# Altium PCB Gear_Trak-v1.0.PcbDoc (part 4 of 5)
Units mil, origin at the board's own origin, x right, y up, seen from the top; angles counter-clockwise.
Board outline 1383 x 2953 mil, 6 copper layers (TOP LAYER, GROUND1, SIGNAL, GROUND2, POWER, BOTTOM LAYER), stack 60.865 mil thick; 166 components, 125 nets, 751 pads, 771 vias.
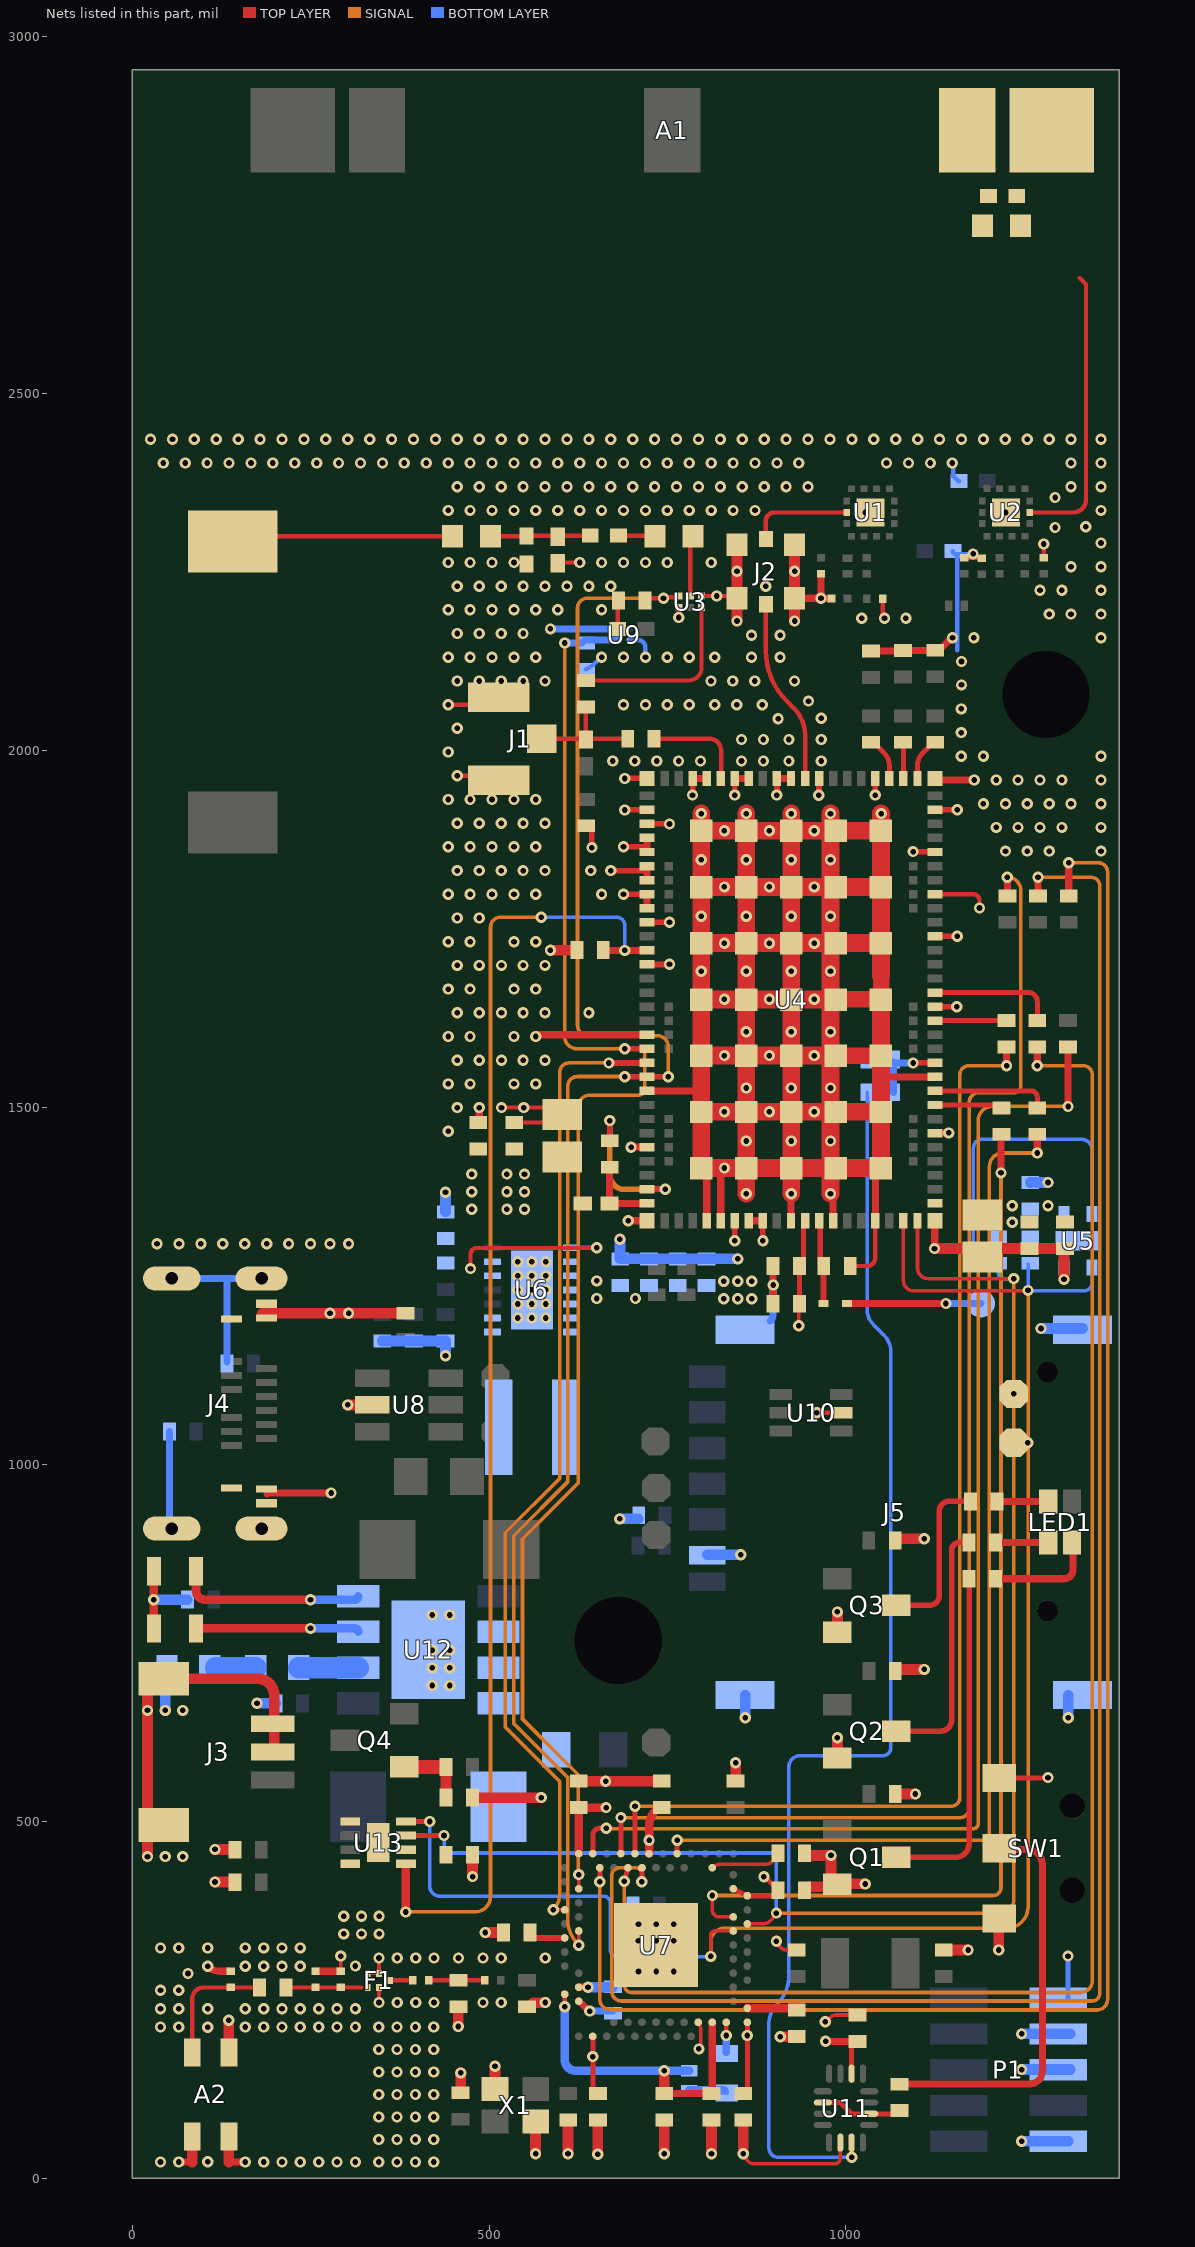
[diagram p6: the nets of this part, all layers, seen from the top]

## Via types
v1: diameter 15.75, hole 7.87, TOP LAYER to BOTTOM LAYER, tented both sides, 771 vias

## Nets (pads, with @x,y where several pads share a name; then routed paths per layer and width w, separated by ;. In a path a pad name is that pad's centre, name@x,y a point inside that pad or via, vN(x,y) a via of type N, cw(c..) or ccw(c..) an arc to the next point about the centre after c; other vN are vias at no path point) (continued)
GND: (continued)
  other v1: 39.84,22.61 106.15,22.76 184.28,22.61 209.98,22.61 235.68,22.61 261.38,22.61 287.08,22.61 312.78,22.61 345.44,22.61 371.14,22.61 396.84,22.61 422.54,22.61 345.44,54.11 371.14,54.11 396.84,54.11 422.54,54.11 345.44,85.61 371.14,85.61 396.84,85.61 422.54,85.61 345.44,117.11 371.14,117.11 396.84,117.11 422.54,117.11 345.44,148.6 371.14,148.6 396.84,148.6 422.54,148.6 345.44,180.1 371.14,180.1 396.84,180.1 422.54,180.1 794,181 39.84,211.6 65.54,211.6 106.15,211.46 158.58,211.6 184.28,211.6 209.98,211.6 235.68,211.6 261.38,211.6 287.08,211.6 312.78,211.6 345.44,211.6 371.14,211.6 396.84,211.6 422.54,211.6 39.84,237.3 65.54,237.3 106.15,237.16 158.58,237.3 184.28,237.3 209.98,237.3 235.68,237.3 261.38,237.3 287.08,237.3 312.78,237.3 371.54,245.88 397.24,245.88 422.94,245.88 491.52,245.88 517.22,245.88 39.84,263 65.54,263 78.3,286.56 709.31,289.32 734,289.32 758.69,289.32 158.58,296.7 184.28,296.7 209.98,296.7 235.68,296.7 312.78,297.14 371.54,308.28 397.24,308.28 422.94,308.28 457.23,308.28 491.52,308.28 517.22,308.28 578.8,308.28 39.84,322.26 65.54,322.26 106.15,322.26 158.58,322.4 184.28,322.4 209.98,322.4 235.68,322.4 709.31,332.69 734,332.69 758.69,332.69 296.63,342 321.31,342 346,342 709.31,355.37 734,355.37 758.69,355.37 296.63,366.69 321.31,366.69 346,366.69 1027,412 46.32,450.37 71,450.37 71,655.09 420.31,690 445,690 420.31,714.69 445,714.69 420.31,739.37 445,739.37 420.31,788.74 445,788.74 35,1308.69 65.7,1308.69 96.4,1308.69 127.1,1308.69 157.8,1308.69 188.5,1308.69 219.2,1308.69 249.9,1308.69 277.28,1308.69 303.32,1308.69 844.23,1312.86 883.6,1312.86 442.8,1466.29 829.71,1493.6 892.7,1493.6 955.69,1493.6 455.65,1499.49 442.8,1532.69 473.5,1532.69 534.9,1532.69 565.6,1532.69 455.65,1565.89 486.35,1565.89 517.43,1565.89 547.75,1565.89 578.45,1565.89 829.71,1572.34 892.7,1572.34 442.8,1599.09 473.5,1599.09 534.9,1599.09 565.6,1599.09 455.65,1632.29 486.35,1632.29 517.43,1632.29 547.75,1632.29 578.45,1632.29 639.85,1632.29 1155.02,1640.87 829.71,1651.08 892.7,1651.08 955.69,1651.08 442.8,1665.49 473.5,1665.49 534.9,1665.49 565.6,1665.49 455.65,1698.69 486.35,1698.69 517.43,1698.69 547.75,1698.69 578.45,1698.69 752.72,1700.13 829.71,1729.82 892.7,1729.82 955.69,1729.82 442.8,1731.89 473.5,1731.89 534.9,1731.89 565.6,1731.89 1156,1739.63 752.72,1759.18 455.65,1765.09 486.35,1765.09 442.8,1798.29 473.5,1798.29 504.2,1798.29 534.9,1798.29 565.6,1798.29 657.7,1798.29 688.4,1798.29 829.71,1808.56 892.7,1808.56 955.69,1808.56 455.65,1831.49 486.35,1831.49 517.05,1831.49 547.75,1831.49 578.45,1831.49 642.35,1831.49 670.55,1831.49 1223.39,1858.77 1253.85,1858.77 1284.55,1858.77 1357.21,1858.77 644.13,1863.71 442.8,1864.69 473.5,1864.69 504.2,1864.69 534.9,1864.69 565.6,1864.69 829.71,1887.3 892.7,1887.3 955.69,1887.3 1210.54,1891.97 1241,1891.97 1271.7,1891.97 1302.4,1891.97 1357.21,1891.97 752.72,1896.71 455.65,1897.89 486.35,1897.89 517.05,1897.89 547.75,1897.89 578.45,1897.89 690.13,1916.39 1156,1916.8 1192.45,1925.17 1223.39,1925.17 1253.85,1925.17 1284.55,1925.17 1315.25,1925.17 1357.21,1925.17 442.8,1931.09 473.5,1931.09 504.2,1931.09 534.9,1931.09 565.6,1931.09 785.02,1937.19 844.07,1937.19 903.13,1937.19 1040.93,1937.19 1179.6,1958.37 1210.54,1958.37 1241,1958.37 1271.7,1958.37 1302.4,1958.37 1357.21,1958.37 690.13,1960.49 673.39,1985 704.09,1985 734.79,1985 765.49,1985 796.19,1985 853.6,1985 884.3,1985 920,1985 965.37,1985 1161.51,1991.57 1192.45,1991.57 1357.21,1991.57 442.8,1997.49 853.6,2015 884.3,2015 920,2015 965.37,2015 1161.51,2024.77 455.65,2030.69 904.86,2044.2 965.37,2045 1161.51,2057.97 688.4,2063.89 719.1,2063.89 749.8,2063.89 780.5,2063.89 816.2,2063.89 846.9,2063.89 882.6,2063.89 947.5,2068.89 1161.75,2091.52 455.65,2097.09 486.35,2097.09 517.05,2097.09 547.75,2097.09 578.45,2097.09 810.85,2097.09 841.55,2097.09 872.25,2097.09 927.91,2097.09 1161.75,2124.37 442.8,2130.29 473.5,2130.29 504.2,2130.29 534.9,2130.29 565.6,2130.29 688.4,2130.29 749.8,2130.29 780.5,2130.29 816.2,2130.29 867.6,2130.29 907.73,2130.29 1179.21,2157.57 1357.21,2157.57 867.6,2160.99 907.73,2160.99 455.65,2163.49 486.35,2163.49 517.05,2163.49 547.75,2163.49 1022,2185 1083.94,2185 765.9,2186 1284.55,2190.77 1315.25,2190.77 1357.21,2190.77 442.8,2196.69 473.5,2196.69 504.2,2196.69 534.9,2196.69 565.6,2196.69 596.3,2196.69 657.7,2196.69 1271.7,2223.97 1302.4,2223.97 1357.21,2223.97 455.65,2229.89 486.35,2229.89 517.05,2229.89 547.75,2229.89 578.45,2229.89 609.15,2229.89 639.85,2229.89 670.55,2229.89 887.66,2229.89 847.29,2250.8 928,2250.8 1315.25,2257.17 1357.21,2257.17 442.8,2263.09 473.5,2263.09 504.2,2263.09 657.7,2263.09 688.4,2263.09 719.1,2263.09 749.8,2263.09 811.2,2263.09 1357.21,2290.37 1292.93,2312.09 1335.92,2313.18 1027,2333 1224,2333 442.8,2336 473.5,2336 504.2,2336 534.9,2336 565.6,2336 596.3,2336 627,2336 657.7,2336 688.4,2336 719.1,2336 749.8,2336 780.5,2336 811.2,2336 841.9,2336 872.6,2336 1357.21,2336 1292.93,2354.05 455.65,2369.2 486.35,2369.2 517.05,2369.2 547.75,2369.2 578.45,2369.2 609.15,2369.2 639.85,2369.2 670.55,2369.2 701.25,2369.2 731.95,2369.2 762.65,2369.2 793.35,2369.2 824.05,2369.2 854.75,2369.2 885.45,2369.2 916.15,2369.2 946.85,2369.2 1315.25,2369.2 1357.21,2369.2 43.7,2402.4 74.4,2402.4 105.1,2402.4 135.8,2402.4 166.5,2402.4 197.2,2402.4 227.9,2402.4 258.6,2402.4 289.3,2402.4 320,2402.4 350.7,2402.4 381.4,2402.4 412.1,2402.4 442.8,2402.4 473.5,2402.4 504.2,2402.4 534.9,2402.4 565.6,2402.4 596.3,2402.4 627,2402.4 657.7,2402.4 688.4,2402.4 719.1,2402.4 749.8,2402.4 780.5,2402.4 811.2,2402.4 841.9,2402.4 872.6,2402.4 903.3,2402.4 934,2402.4 1056.8,2402.4 1087.5,2402.4 1118.2,2402.4 1315.25,2402.4 1357.21,2402.4 25.85,2435.6 56.55,2435.6 87.25,2435.6 117.95,2435.6 148.65,2435.6 179.35,2435.6 210.05,2435.6 240.75,2435.6 271.45,2435.6 302.15,2435.6 332.85,2435.6 363.55,2435.6 394.25,2435.6 424.95,2435.6 455.65,2435.6 486.35,2435.6 517.05,2435.6 547.75,2435.6 578.45,2435.6 609.15,2435.6 639.85,2435.6 670.55,2435.6 701.25,2435.6 731.95,2435.6 762.65,2435.6 793.35,2435.6 824.05,2435.6 854.75,2435.6 885.45,2435.6 916.15,2435.6 946.85,2435.6 977.55,2435.6 1008.25,2435.6 1038.95,2435.6 1069.65,2435.6 1100.35,2435.6 1131.05,2435.6 1161.75,2435.6 1192.45,2435.6 1223.15,2435.6 1253.85,2435.6 1284.55,2435.6 1315.25,2435.6 1357.21,2435.6
GPS_RF1: C13.1 U3.3 | length 256.8
  TOP LAYER w5.75: C13.1@635.64,2097.84 779.73,2097.84 ccw(c779.73,2115.74) 797.63,2115.74 U3.3@797.63,2200.3
I2C_SCL: R31.2 TP5.1 U4.20 U5.2 U7.R1 U13.7 | length 2591.4
  TOP LAYER w5: U7.R1@861.85,356.02 883.08,356.02 ccw(c883.08,371.7) 895.48,362.11 v1(902.49,371.17) ; U4.20@1100.16,1340.94 1100.16,1274.84 ccw(c1115,1274.84) 1115,1260 v1(1235,1260)
  TOP LAYER w7: U13.7@383.64,479.84 v1(437,479.84)
  SIGNAL w5: v1(902.49,371.17) 1215.59,371.17 ccw(c1215.59,390.58) 1235,390.58 v1(1235,1260)
  BOTTOM LAYER w5: v1(437,479.84) 437,463.15 ccw(c444.81,463.15) 444.81,455.34 894.03,455.34 cw(c894.03,446.88) 902.49,446.88 v1(902.49,371.17) ; v1(1235,1260) 1221.8,1260 cw(c1221.8,1268.37) 1213.43,1268.37 1213.43,1281.5 R31.2@1213,1281.5 1191.65,1281.5 cw(c1191.65,1294.64) 1178.51,1294.64 1178.51,1442.64 cw(c1190.86,1442.64) 1190.86,1455 1330.08,1455 cw(c1330.08,1440.39) 1344.68,1440.39 U5.2@1344.69,1350.4
  other v1: 1235,1098.52
I2C_SDA: R32.2 TP4.1 U4.19 U5.3 U7.P2 U13.8 | length 2444.3
  TOP LAYER w5: v1(810.56,310.51) 810.56,340.36 cw(c816.38,340.36) 816.38,346.18 U7.P2@842.17,346.18 ; U4.19@1080.48,1340.94 1080.48,1256.88 ccw(c1094.36,1256.88) 1094.36,1243 v1@1255,1243
  TOP LAYER w7: U13.8@383.64,499.53 v1(417,499.53)
  SIGNAL w5: v1(810.56,310.51) 810.56,330.56 cw(c830,330.56) 830,350 1225,350 ccw(c1225,380) 1255,380 v1(1255,1243.37)
  BOTTOM LAYER w5: v1(417,499.53) 417,409 ccw(c431,409) 431,395 660,395 cw(c660,385) 670,385 670,320.4 ccw(c680.4,320.4) 680.4,310 810.56,310 v1(810.56,310.51) ; R32.2@1255,1280 v1(1255,1243.37) 1255,1243 1334,1243 ccw(c1334,1253.69) 1344.69,1253.69 U5.3@1344.69,1275.6
  other v1: 1254.69,1030.01
LTE_RF: J2.3 U1.13 | length 145.2
  TOP LAYER w6.17: J2.3@887.66,2295.81 887.66,2320.95 cw(c899.79,2320.95) 899.79,2333.07 U1.13@1000.82,2333.07
MCU_IF0: R33.1 U7.T2 | length 1522.1
  TOP LAYER w5: v1(812.88,395.8) 812.64,395.55 812.64,375.92 ccw(c822.69,375.92) 822.69,365.87 U7.T2@842.17,365.87
  TOP LAYER w10: v1@1217,1406.87 R33.1@1217,1462.14
  SIGNAL w5: v1(812.88,395.8) 1205.83,395.8 ccw(c1205.83,407.06) 1217.1,407.06 v1(1217.1,1408)
MCU_IF1: R36.1 U7.AD10 | length 1501.9
  TOP LAYER w7: U7.AD10@763.43,454.45 763.49,454.52 763.49,474.12 v1@763.56,474.19
  TOP LAYER w10: v1(1268,1435.89) R36.1@1268,1462.14
  SIGNAL w5: v1(763.56,473.19) 1193.57,473.19 ccw(c1193.57,480.5) 1200.89,480.5 1200.89,1416.93 cw(c1219.84,1416.93) 1219.84,1435.89 v1(1268,1435.89)
MCU_IF2: R37.1 U7.AD16 | length 1639.6
  TOP LAYER w7: U7.AD16@704.45,454.53 v1@704.45,520.91
  TOP LAYER w10: v1(1225,1558) R37.1@1225,1584.25
  SIGNAL w5: v1(704.53,520.91) 1147.25,520.91 ccw(c1147.25,533.23) 1159.58,533.23 1159.58,1545.69 cw(c1171.88,1545.69) 1171.88,1558 v1(1225,1558)
MCU_IF3: R38.1 U7.AC17 | length 2215.4
  TOP LAYER w7: v1@689.45,415.83 U7.AC17@694.53,434.76
  TOP LAYER w10: v1(1268,1558) R38.1@1268,1584.25
  SIGNAL w5: v1(689.37,415.78) 689.37,270.63 ccw(c700,270.63) 700,260 1328.59,260 ccw(c1328.59,276.41) 1345,276.41 1345,1545.74 ccw(c1332.74,1545.74) 1332.74,1558 v1(1268,1558)
MCU_IF4: R39.1 U7.AD22 | length 1780
  TOP LAYER w7: U7.AD22@645.31,454.45 645.31,480.21 cw(c655.19,480.21) 655.19,490.08 v1(664.17,490.08)
  TOP LAYER w10: R39.1@1311,1584.25 R39.1@1311,1584.25 v1@1311.04,1502
  SIGNAL w5: v1(664.17,490.08) 664.76,489.48 1178.61,489.48 ccw(c1178.61,496.06) 1185.19,496.06 1185.19,1481.32 cw(c1204.94,1481.32) 1204.94,1501.07 v1(1311.07,1501.07)
MCU_IF5: R40.1 U7.AC21 | length 2599.5
  TOP LAYER w7: v1@655.09,415.09 U7.AC21@655.09,434.7
  TOP LAYER w10: R40.1@1312,1796.05 v1(1312,1842.3)
  SIGNAL w5: v1(655.02,415.02) 655.02,251.01 ccw(c670.53,251.01) 670.53,235.5 1351.72,235.5 ccw(c1351.72,250.14) 1366.36,250.14 1366.36,1829.61 ccw(c1353.63,1829.57) 1353.63,1842.3 v1(1312,1842.3)
MCU_IF6: R41.1 U7.AC15 | length 2614.6
  TOP LAYER w7: v1@714.15,415.09 U7.AC15@714.15,434.7
  TOP LAYER w10: R41.1@1269,1796.05 v1(1269,1822.3)
  SIGNAL w5: v1(714.08,415.02) 714.08,426.12 ccw(c705.68,426.12) 705.68,434.52 682.18,434.52 ccw(c682.18,424.13) 671.8,424.13 671.8,261.81 ccw(c685.5,261.81) 685.5,248.1 1344.97,248.1 ccw(c1344.97,258.49) 1355.36,258.49 1355.36,1810.25 ccw(c1343.31,1810.25) 1343.31,1822.3 v1(1269,1822.3)
MCU_IF7: R42.1 U7.AD18 | length 1949.6
  TOP LAYER w7: U7.AD18@684.69,454.45 v1(684.68,505)
  TOP LAYER w10: R42.1@1226,1796.05 v1(1226,1822.3)
  SIGNAL w5: v1@684.76,505 1160,505 ccw(c1160,517.58) 1172.58,517.58 1172.58,1506.76 cw(c1186.1,1506.76) 1186.1,1520.28 1234.89,1520.28 ccw(c1234.89,1530.4) 1245,1530.4 1245,1803.3 ccw(c1226,1803.3) v1(1226,1822.3)
NetA1_2: A1.2 C1.2 L1.2
NetANT1_1: ANT1.1 L7.2 | length 311
  TOP LAYER w6.17: ANT1.1@141,2292.54 148,2299.54 L7.2@449.08,2299.54
NetC8_1: C8.1 L6.2 | length 51.9
  TOP LAYER w6.17: C8.1@681.17,2300.54 731.62,2300.54 L6.2@732.62,2299.54
NetC12_1: C12.1 C13.2 J1.1 L9.2 | length 166.5
  TOP LAYER w6.17: J1.1@573.68,2016.17 L9.2@635.64,2016.17 ; L9.2@635.64,2014.94 L9.2@635.64,2016.17 ; C13.2@635.64,2060.84 L9.2@635.64,2016.17 ; C12.1@694.26,2016.17 L9.2@635.64,2016.17
NetC12_2: C12.2 U4.67 | length 142.8
  TOP LAYER w6.17: C12.2@731.26,2016.17 808.83,2016.17 cw(c808.83,2000) 825,2000 825,1960.62 U4.67@824.57,1960.62
NetC23_1: C23.1 R13.2 U4.32 | length 100.4
  TOP LAYER w7.87: v1(1094,1562) 1094.1,1562.1 U4.32@1124.42,1562.1
  BOTTOM LAYER w10: R13.2@1066.5,1521 1066.5,1563 1067.5,1562 v1(1094,1562)
NetC34_2: C34.2 L12.1 L13.2 | length 78.3
  TOP LAYER w6.17: L12.1@415.57,277.08 C34.2@457.23,277.08 L13.2@493.9,277.08
NetC35_2: C35.2 CR1.2 F1.4 R18.2 | length 105.3
  TOP LAYER w6.17: R18.2@215.5,267 320.8,267
NetC37_1: C37.1 U7.N24 | length 53.1
  TOP LAYER w7.87: C37.1@557.5,344 557.5,341.35 562.56,336.28 U7.N24@605.94,336.34
NetC49_2: C49.2 R11.1 U6.1 U6.12 U6.13 | length 238.2
  TOP LAYER w5.9: v1(474,1274) 474,1294 cw(c483,1294) 483,1303 v1(651,1303)
  BOTTOM LAYER w5.9: U6.1@615.12,1303.15 651,1303.15 v1(651,1303)
NetC54_1: C54.1 U7.AC5 | length 100.7
  TOP LAYER w5: U7.AC5@812.64,434.76 cw(c823.98,423.43) 816.77,437.75 cw(c823.98,423.43) 823.98,439.46 886.56,439.46 ccw(c886.56,455) 897.78,444.25 898.5,445 C54.1@905,455
NetD1_1: D1.1 TP1.1 | length 187.5
  TOP LAYER w10: D1.1@1001.54,1225 v1(1140,1225)
  BOTTOM LAYER w10: v1(1140,1225) TP1.1@1189,1225
NetFB1_2: FB1.2 R2.2 U4.102 | length 104
  TOP LAYER w10: FB1.2@668.7,1365 FB1.2@668.7,1365.35 ; R2.2@669,1416 668.7,1416 FB1.2@668.7,1365.35 ; U4.102@721.43,1365.35 FB1.2@668.7,1365.35
NetJ2_1: J2.1 U4.61 | length 259.5
  TOP LAYER w6.17: J2.1@887.66,2203.92 887.66,2139.76 ccw(c987.66,2139.76) 916.95,2069.05 927,2059 cw(c889.13,2021.13) 942.69,2021.13 U4.61@942.69,1960.62
NetL6_1: L6.1 U3.5 | length 85.1
  TOP LAYER w6.17: U3.5@781.88,2216.04 781.88,2295.65 L6.1@785.77,2299.54
NetL10_1: L10.1 U6.8 U6.9
NetL10_2: L10.2 U6.6 U6.7
NetL11_1: L11.1 U12.8
NetL14_1: L14.1 L15.2 | length 54.4
  BOTTOM LAYER w5.91: L15.2@829.65,122.79 cw(c829.65,119.44) L15.2@833,119.44
  BOTTOM LAYER w12: L14.1@780.5,122.79 L15.2@829.65,122.79
NetL15_1: L15.1 U7.B3 | length 43.9
  TOP LAYER w5.91: v1(832.32,199.79) U7.B3@832.32,218.23
  BOTTOM LAYER w5.91: L15.1@832.32,176.19 ccw(c834.63,176.19) L15.1@833,174.56
  BOTTOM LAYER w10: L15.1@832.32,176.19 v1(832.32,199.79)
NetLED1_1: LED1.1 R20.2 | length 154.8
  TOP LAYER w10: R20.2@1209.5,839.53 1305.53,839.53 ccw(c1305.53,852) 1318,852 1318,889.19 ccw(c1316.73,889.19) LED1.1@1316.73,890.46
NetLED1_2: LED1.2 R19.2 | length 73.8
  TOP LAYER w10: R19.2@1209.5,890.46 LED1.2@1283.27,890.46
NetLED1_3: LED1.3 R21.2 | length 71.8
  TOP LAYER w10: R21.2@1211.5,947.54 LED1.3@1283.27,947.54
NetLED2_1: LED2.1 LED3.1 R25.2 | length 126.6
  TOP LAYER w12: LED2.1@30.47,770 LED3.1@30.47,850
  BOTTOM LAYER w15: v1(30.47,810) R25.2@77.02,810
NetLED2_2: LED2.2 U12.3 | length 230
  TOP LAYER w12: LED2.2@89.53,770 v1(250,770)
  BOTTOM LAYER w12: v1(250,770) 311.67,770 cw(c311.67,765) U12.3@316.67,765
NetLED3_2: LED3.2 U12.4 | length 264.3
  TOP LAYER w12: LED3.2@89.53,850 89.53,823.31 ccw(c102.83,823.31) 102.83,810 v1(250,810)
  BOTTOM LAYER w12: v1(250,810) 311.67,810 ccw(c311.67,815) U12.4@316.67,815
NetQ1_3: Q1.3 R20.1 | length 483.9
  TOP LAYER w7.87: Q1.3@1070.48,449.23 1152.91,449.23 ccw(c1152.91,468.81) 1172.5,468.81 R20.1@1172.5,839.53
NetQ2_3: Q2.3 R19.1 | length 355
  TOP LAYER w7.87: Q2.3@1070.49,625.82 1070.49,626 1132,626 ccw(c1132,642) 1148,642 1148,879.32 cw(c1159.13,879.32) 1159.13,890.46 R19.1@1172.5,890.46
NetQ3_3: Q3.3 R21.1 | length 238.3
  TOP LAYER w7.87: Q3.3@1070.49,802.23 1116.68,802.23 ccw(c1116.68,816.13) 1130.58,816.13 1130.58,934.12 cw(c1144.47,934.12) 1144.47,948 1174.5,948 R21.1@1174.5,947.54
NetQ4_1: Q4.1 R12.2 R14.2 | length 101.8
  TOP LAYER w7: R12.2@436.26,575.9 R12.2@439.73,575.9
  TOP LAYER w15: R14.2@439.73,532.9 R12.2@439.73,575.9
  TOP LAYER w20: Q4.1@380.96,575.9 R12.2@436.26,575.9
NetR2_1: R2.1 U4.101 | length 219.1
  TOP LAYER w7.87: R2.1@669,1453 v1(669.02,1481.26) ; U4.101@721.43,1385.03 v1(747,1385)
  SIGNAL w7.87: v1(669.02,1481.26) 669.02,1405.98 ccw(c690,1405.98) 690,1385 v1(747,1385)
NetR4_1: R4.1 U4.55 | length 62.2
  TOP LAYER w7: R4.1@1035.01,2011.13 1038.51,2011.13 1053.55,1996.09 ; 1053.57,1996.07 cw(c1036.05,1978.59) 1060.8,1978.59 U4.55@1060.8,1960.62
NetR5_1: R5.1 U4.54 | length 50.5
  TOP LAYER w7: U4.54@1080.48,1960.62 R5.1@1080.48,2011.13
NetR6_1: R6.1 U4.53 | length 62.2
  TOP LAYER w7: U4.53@1100.17,1960.62 1100.17,1978.59 cw(c1124.91,1978.59) 1107.39,1996.07 ; 1107.41,1996.09 1122.46,2011.13 R6.1@1125.96,2011.13
NetR13_1: R13.1 U11.7 | length 1772.5
  TOP LAYER w5.98: v1@1007.87,29.35 U11.7@1007.87,49.77
  BOTTOM LAYER w5: v1(1008.04,29.19) 905.04,29.19 cw(c905.04,42.14) 892.09,42.14 892.09,216.66 cw(c929.34,216.66) 903,243 903.49,243.49 ccw(c863.65,283.34) 920,283.34 920,575.92 cw(c935.58,575.92) 935.58,591.49 1051.49,591.49 ccw(c1051.49,602.85) 1062.85,602.85 1062.85,1156.93 ccw(c1028.83,1156.93) 1052.88,1180.99 1038.16,1195.7 cw(c1059.08,1216.62) 1029.5,1216.62 R13.1@1029.5,1521
NetR26_1: R26.1 U12.6
NetR27_1: R27.1 R28.2 | length 56.4
  BOTTOM LAYER w30: R28.2@116.9,715 117.04,715.14 R27.1@173.22,715.14
NetR27_2: R27.2 U12.2 | length 83.6
  BOTTOM LAYER w7.87: R27.2@233.22,715 R27.2@233.22,715.15
  BOTTOM LAYER w30: R27.2@233.22,715 U12.2@316.67,715
NetR30_2: R30.2 U13.6
NetR33_2: R33.2 U4.29 | length 99.4
  TOP LAYER w7: U4.29@1124.57,1503.14 R33.2@1224,1503.14
NetR35_1: R35.1 U11.2 U11.10 | length 116.5
  TOP LAYER w7.01: U11.2@967.52,105.87 991.94,105.87 1007.71,90.1 U11.10@1032.48,90.13 ; U11.10@1032.48,90.13 1070.63,90.13 ccw(c1070.63,94.5) R35.1@1075,94.5
NetR35_2: R35.2 SW1.2 | length 573.5
  TOP LAYER w9.84: R35.2@1075,131.5 1256.5,131.5 ccw(c1256.5,150) 1275,150 1275,440 ccw(c1255,440) 1255,460 1216.7,460 cw(c1216.7,462.06) SW1.2@1214.64,462.06
NetR36_2: R36.2 U4.30 | length 163.3
  TOP LAYER w7: U4.30@1124.57,1522.83 1259.17,1522.83 cw(c1259.17,1514) 1268,1514 R36.2@1268,1499.14
NetR37_2: R37.2 U4.35 | length 100.4
  TOP LAYER w7: U4.35@1124.57,1621.25 R37.2@1225,1621.25
NetR38_2: R38.2 U4.37 | length 177.4
  TOP LAYER w7: U4.37@1124.57,1660.62 1255.53,1660.62 cw(c1255.53,1648.15) 1268,1648.15 R38.2@1268,1621.25